# Altium PCB VCU 2026 PCB SID.PcbDoc (part 2 of 2)
Units mm, origin at the board's own origin, x right, y up, seen from the top; angles counter-clockwise.
Board outline 180 x 100 mm, 2 copper layers (Top Layer, Bottom Layer); 108 components, 87 nets, 411 pads, 271 vias.
Unrouted connection lines stored in the file: 2.
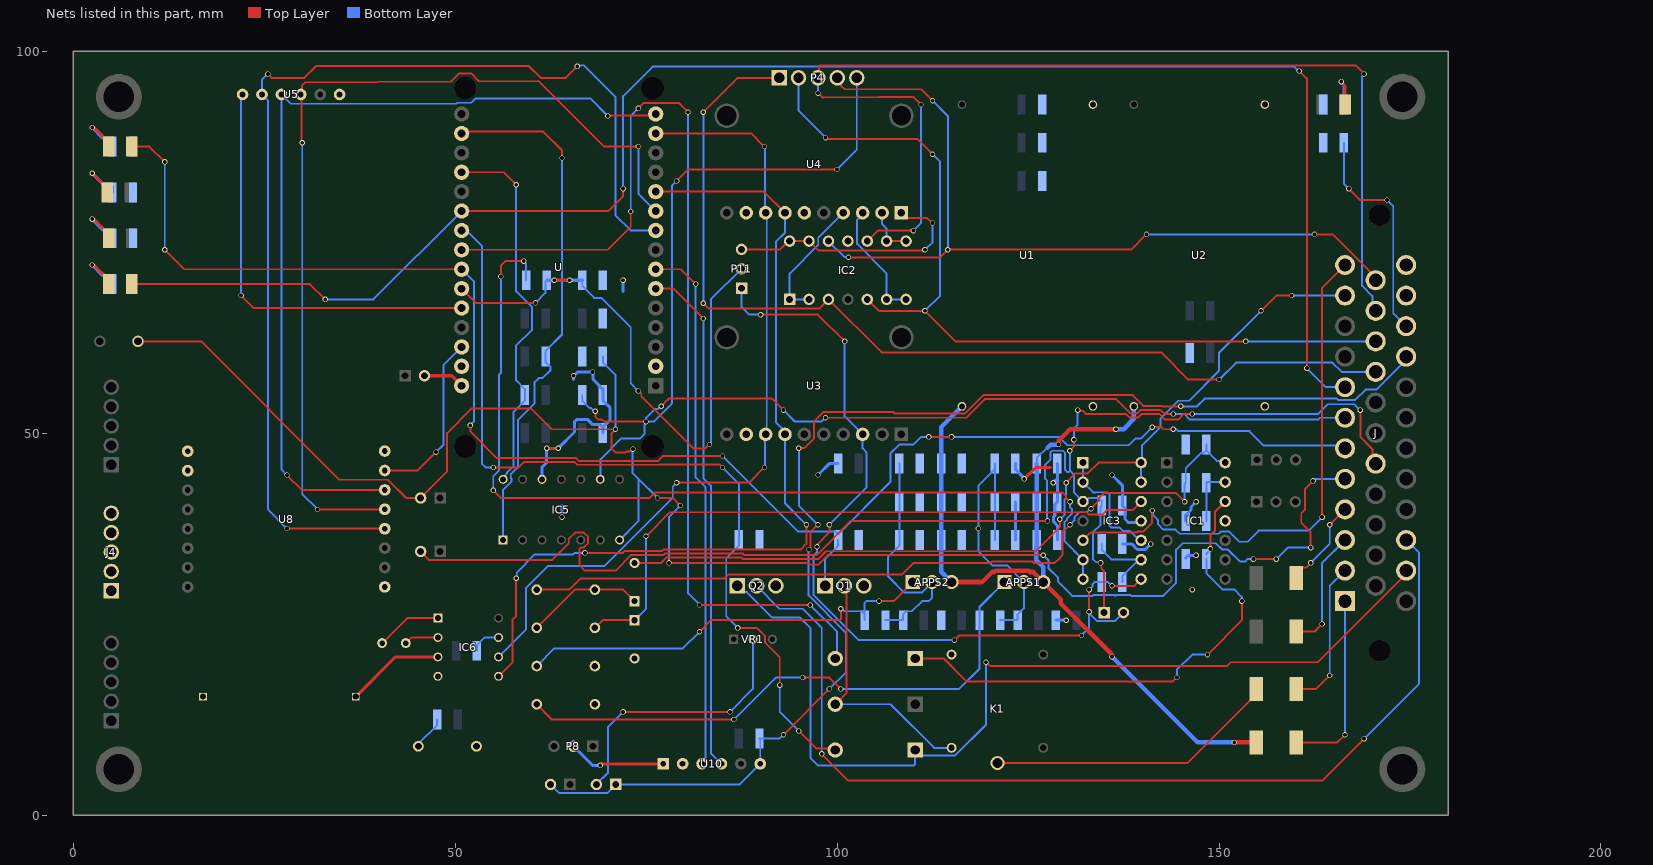
[diagram p2: the nets of this part, all layers, seen from the top]

## Via types
v1: diameter 0.7, hole 0.5, Top Layer to Bottom Layer, 270 vias
v2: diameter 3.5, hole 2.1, Top Layer to Bottom Layer, 1 vias

## Nets (pads, with @x,y where several pads share a name; then routed paths per layer and width w, separated by ;. In a path a pad name is that pad's centre, name@x,y a point inside that pad or via, vN(x,y) a via of type N, cw(c..) or ccw(c..) an arc to the next point about the centre after c; other vN are vias at no path point) (continued)
CANL: J.32 P2.2 P5.1 R49.1 U10.6 | length 168.2
  Top Layer w0.254: v1(93,10.5) v1(99,16.5) ; v1(95,48) 95.037,48.037 95.731,48.037 97,49.306 97,51.534 98.197,52.731 107.384,52.731 107.561,52.554 116.747,52.554 119.147,54.954 138.739,54.954 140.169,53.524 142.574,53.524 142.598,53.5 v1(145,53.5) ; v1(96.325,34.747) 96.325,34.868 96.5,35.042 96.5,37 v1(97.5,38)
  Bottom Layer w0.254: P2.2@62.5,4 63.631,2.869 69.909,2.869 P5.1@71.04,4 87.25,4 U10.6@89.95,6.7 89.95,9.9 R49.1@89.85,10 92.466,10 92.966,10.5 v1(93,10.5) ; v1(95,48) 95,40.5 v1(97.5,38) ; v1(96.325,34.747) 96.269,34.691 96.269,28.746 101.151,23.864 101.151,18.651 v1(99,16.5) ; v1(145,53.5) 147.121,53.5 148.121,54.5 165.434,54.5 165.635,54.3 167.8,54.3 169.193,55.694 170.588,55.694 174.5,59.605 J.32@174.5,60
CANL_Switch: P5.2 VR1.2 | length 35.7
  Top Layer w0.254: v1(72,13.5) v1(86,13.5)
  Bottom Layer w0.254: P5.2@68.5,4 70,5.5 70,11.5 v1(72,13.5) ; v1(86,13.5) 89,16.5 VR1.2@89,23
CS: IC3.3 J.17 P3.1 P7.2 R16.1 | length 186.5
  Top Layer w0.254: P7.2@45.5,34.5 46.631,33.369 62.655,33.369 64.886,35.6 64.886,36.144 65.708,36.966 66.86,36.966 67.426,36.4 67.426,35.6 66.86,35.034 66.534,35.034 66.269,34.769 66.269,32.731 67,32 71.007,32 73.063,34.056 77.304,34.056 77.487,34.239 87.657,34.239 87.88,34.016 97.331,34.016 101.815,38.5 v1(127.554,38.5) ; v1(130.468,47.671) 131,48.203 v1(131,49.133) ; v1(131.5,53) 131.585,52.915 132.135,52.915 132.55,52.5 137.799,52.5 138.253,52.046 139.457,52.046 139.906,52.495 142.166,52.495 142.892,51.769 144.673,51.769 145.404,52.5 v1(146.5,52.5) ; v1(134.5,33) 134.585,32.915 134.585,32.301 134.96,31.926 P3.1@134.96,26.5 ; v1(168.5,53) 168.5,49.502 170.089,47.913 170.089,46.411 J.17@170.5,46
  Bottom Layer w0.254: v1(127.554,38.5) 127.5,38.554 127.5,43.78 127.219,44.061 127.219,45.803 127.919,46.503 127.919,47.01 127.919,47.458 128.142,47.681 128.589,47.681 129.558,47.681 129.849,47.39 129.849,45.182 130.141,44.89 130.351,44.89 130.5,45.039 ; v1(130.468,47.671) 130.5,47.639 130.5,45.039 ; v1(131,49.133) 131,50.608 131.5,51.108 v1(131.5,53) ; v1(134.5,33) 134.415,33.085 133.915,33.085 133.496,33.504 133.496,36.996 134.5,38 134.5,40.35 R16.1@134.65,40.5 134.65,41.049 134.227,41.472 133.868,41.472 133.84,41.5 132.962,41.5 132.502,41.04 IC3.3@132.19,41.04 131,42.23 131,44.539 130.5,45.039 ; v1(146.5,52.5) 146.519,52.481 156.422,52.481 156.441,52.5 163,52.5 164.267,53.767 167.733,53.767 v1(168.5,53)
CS_amped: IC3.8 P3.2 P11.1 R5.1 U3.3 | length 112.5
  Top Layer w0.254: v1(90,65.492) 90.008,65.5 97.5,65.5 v1(101,62) ; v1(97.388,35.106) 97.473,35.192 97.473,35.473 99,37 v1(99,38) ; v1(115.38,22.896) 115.984,23.5 v1(132,23.5) ; v1(133,26.615) v1(133,29.5) ; v1(136,30) 138.92,30 139.8,30.88 IC3.8@139.81,30.88
  Bottom Layer w0.254: P11.1@87.5,68.96 87.5,66.5 88.508,65.492 v1(90,65.492) ; v1(97.388,35.106) 97.375,35.094 97.375,34.375 96.948,33.948 96.948,28.784 102.837,22.896 v1(115.38,22.896) ; v1(99,38) 103.854,42.854 103.854,47.488 103.35,47.992 U3.3@103.35,49.832 101,52.182 v1(101,62) ; v1(132,23.5) 133,24.5 v1@133,26.336 ; v1(133,26.615) 133.085,26.53 133.085,26.336 134.052,25.369 136.369,25.369 P3.2@137.5,26.5 ; v1(133,29.5) 133.445,29.945 133.445,30.226 133.719,30.5 R5.1@134.65,30.5 135.5,30.5 v1(136,30)
CS_buff: IC3.1 IC3.2 IC3.10 | length 15.7
  Bottom Layer w0.254: IC3.1@132.19,46.12 IC3.2@132.19,43.58 133.529,42.241 133.899,42.241 133.912,42.254 135.388,42.254 135.654,41.988 135.654,37.884 135.888,37.65 136.962,37.65 137.431,37.181 138.319,37.181 139.54,35.96 IC3.10@139.81,35.96
CS_LR: U8.15 U.28 | length 22.9
  Top Layer w0.254: U8.15@40.8,45.1 45.1,45.1 v1(47.5,47.5)
  Bottom Layer w0.254: v1(47.5,47.5) 48.5,48.5 48.5,58.916 U.28@50.863,61.279
CS_SD: U5.1 U.26 | length 55.9
  Top Layer w0.254: v1(22,68) 23.641,66.359 U.26@50.863,66.359
  Bottom Layer w0.254: v1(22,68) 22,94.132 U5.1@22.189,94.321
ESP_5V: P1.2 U.30 | length 5.4
  Top Layer w0.4: P1.2@46,57.5 49.562,57.5 U.30@50.863,56.199
GND: B1.N B2.1 C2.2 C3.1 C4.1 C5.1 C6.1 C7.1 C8.1 C9.1 C10.1 C11.1 C12.1 C13.1 C14.1 C15.1 C16.1 C17.1 IC1.11 IC2.11 IC3.11 IC5.12 IC6.4 J4.1 J4.2 J4.3 J4.4 J4.5 J.34 J.35 K1.4 Q1.3 Q2.3 R6.1 R9.2 R10.1 R13.1 R14.1 R15.1 R16.2 R24.1 R25.1 R28.1 R29.1 R30.2 R31.1 R33.1 R38.2 R39.2 R41.2 R42.1 R43.1 R44.1 R45.2 R46.1 R50.2 R51.1 U1.2 U1.3 U2.2 U2.3 U3.9 U4.6 U4.9 U5.6 U8.1 U8.2 U8.9 U8.16 U10.2 U.2 U.29 | length 75.1
  Top Layer w0.4: v1(62,48) v1(63.5,48) ; v1(124.5,44) 126,45.5 127.95,45.5
  Bottom Layer w0.4: IC5.12@61.38,43.94 61.38,45.525 62,46.145 v1(62,48) ; v1(63.5,48) 65.646,50.146 65.646,51.488 65.912,51.754 67.388,51.754 68.042,51.1 69,51.1 R9.2@69.35,50.75 ; v1(64,39) 64,40.5 ; 65.5,57 v1(65.5,57.5) 65.581,57.5 66.081,58 v1(68,58) 68.05,57.95 68.05,57.05 69.35,55.75 R41.2@69.35,55 69.35,54.25 70.304,53.296 70.304,51.704 R9.2@69.35,50.75 ; R9.2@69.35,50 R9.2@69.35,50.75 ; 72,68.5 v1(72,70) ; v1(97.5,44.5) 99,46 R28.1@100.15,46 ; C14.1@123.35,36 C13.1@123.35,41 ; C9.1@123.35,46 123.35,45.25 124.443,44.157 124.443,44.057 v1(124.5,44) ; v1(128.3,43.5) 128.3,43.55 128.85,44.1 ; R13.1@128.65,25.5 v1(130,25.5) ; C8.1@128.85,36 128.85,37.884 128.358,38.377 128.358,39.043 128.5,39.185 128.5,40.65 C7.1@128.85,41 128.85,44.1 ; C6.1@128.85,46 128.85,44.1 ; v1(136,44.5) 137.35,43.15 R16.2@137.35,40.5 137.688,40.162 137.688,38.746 138.159,38.275 139.287,38.275 139.512,38.5 IC3.11@139.81,38.5 ; R6.1@137.35,35.5 138.567,35.5 139.311,34.756 140.357,34.756 v1(141.073,35.472) ; R42.1@145.65,33.65 146,34 v1(147,34) ; R45.2@145.65,38.5 145.65,39.25 146.328,39.928 146.328,40.328 v1(147,41)
  other v1: 146.5,29.5
Log_Switch: IC5.9 J.7 P4.5 R41.1 | length 187.7
  Top Layer w0.254: v1(68.352,52.852) 68.379,52.825 68.379,52.121 68.731,51.769 69.231,51.769 69.5,51.5 v1(75,51.5) ; v1(77,53.5) 77.453,53.953 77.453,54.011 77.942,54.5 91.5,54.5 v1(93,53) ; v1(79,83) 80.5,84.5 v1(100,84.5) ; v1(98.5,52) 116.911,52 119.357,54.446 136.571,54.446 138.463,52.554 139.247,52.554 139.696,53.003 142.377,53.003 142.879,52.5 v1(144,52.5)
  Bottom Layer w0.254: R41.1@66.65,55 66.65,54.25 67.593,53.307 67.777,53.307 68.231,52.852 v1(68.352,52.852) ; IC5.9@69,43.94 69.05,43.99 69.05,46.584 71.759,49.293 74.237,49.293 74.793,49.849 74.793,51.172 75,51.379 v1(75,51.5) ; v1(77,53.5) 76.879,53.5 76.523,53.143 76.143,53.143 75.013,52.013 75.013,51.513 v1(75,51.5) ; v1(79,83) 78.419,82.419 78.419,53.919 76,51.5 v1(75,51.5) ; v1(93,53) 94.5,51.5 97.966,51.5 98.466,52 v1(98.5,52) ; v1(100,84.5) 102.58,87.08 P4.5@102.58,96.5 ; v1(144,52.5) 145.466,52.5 146.197,51.769 162.987,51.769 163.218,52 J.7@166.5,52
Log_Switch*: IC5.14 R36.2 U.19 | length 49.8
  Top Layer w0.254: U.19@50.863,84.139 56.361,84.139 v1(58,82.5)
  Bottom Layer w0.254: IC5.14@56.3,43.94 56.3,44.188 56.785,44.673 56.785,44.791 57.624,45.63 57.624,52.724 59.15,54.25 R36.2@59.15,55 59.15,55.75 58,56.9 58,61.461 60.081,63.542 60.081,66.458 58,68.539 v1(58,82.5)
LogLed: D2.1 J.8 U.21 | length 219.5
  Top Layer w0.254: D2.1@7.652,69.5 31,69.5 v1(33,67.5) ; U.21@50.863,79.059 70.059,79.059 72,81 v1(72,82) ; v1(160.5,97.381) 161.5,96.381 v1(161.5,58.5)
  Bottom Layer w0.254: v1(33,67.5) 39.304,67.5 U.21@50.863,79.059 ; v1(72,82) 72,94.109 75.857,97.966 159.872,97.966 160.457,97.381 v1(160.5,97.381) ; v1(161.5,58.5) 164,56 J.8@166.5,56
LVMSOut: APPS1.3 APPS2.3 C3.2 C4.2 C5.2 C6.2 C7.2 C8.2 F1.2 U1.1 U2.1 | length 108.5
  Top Layer w0.254: APPS1.3@127,30.5 APPS1.3@127,30.801
  Top Layer w0.6: APPS2.3@115,30.5 119,30.5 120.311,31.811 120.588,31.811 120.761,31.984 125.075,31.984 125.248,31.811 125.689,31.811 126.699,30.801 APPS1.3@127,30.801 ; APPS1.3@127,30.5 129.258,28.242 129.258,27.742 135.971,21.029 135.971,20.75 v1(135.991,20.731) ; v1(129,48.5) 129.019,48.519 129.019,49.019 130.5,50.5 v1(136.5,50.5) ; v1(152,9.5) F1.2@154.885,9.5
  Bottom Layer w0.254: C6.2@126.15,46 126.15,46.75 127.505,48.105 127.603,48.105
  Bottom Layer w0.6: APPS2.3@115,30.5 113.65,31.85 C5.2@113.65,36 C4.2@113.65,41 C3.2@113.65,46 113.65,50.795 U1.1@116.355,53.5 ; C6.2@126.15,46 C7.2@126.15,41 126.15,35.25 126.096,35.196 126.096,33.372 127,32.468 APPS1.3@127,30.5 ; 127.603,48.105 127.979,48.481 128.981,48.481 v1(129,48.5) ; v1(135.991,20.731) 147.222,9.5 v1(152,9.5) ; v1(136.5,50.5) 136.519,50.519 137.519,50.519 138.855,51.855 U2.1@138.855,53.5
LVMSOut*: F1.1 J.1 | length 24.3
  Top Layer w0.254: F1.1@160.115,9.5 165.5,9.5 v1(166.5,10.5)
  Bottom Layer w0.254: v1(166.5,10.5) J.1@166.5,28
MC_Revert: IC3.5 J.12 | length 72
  Top Layer w0.254: IC3.5@132.19,35.96 133.23,37 139.251,37 139.342,37.091 140.104,37.091 141.255,38.243 v1(141.255,39.852) ; v1(163.5,39) 163.5,69 J.12@166.5,72
  Bottom Layer w0.254: v1(141.255,39.852) 141.341,39.767 141.341,39.287 142.031,38.597 142.031,38.059 142.722,37.369 144.289,37.369 144.839,36.819 149.966,36.819 150.238,37.091 151.326,37.091 152.648,35.769 153.735,35.769 155.197,37.231 161.731,37.231 v1(163.5,39)
MC_Revert*: IC3.6 IC3.7 R23.2 | length 124.2
  Top Layer w0.254: v1(55,42.5) 56,41.5 75.466,41.5 76.197,42.231 129.5,42.231 129.963,41.768 129.963,41.549 v1(130.512,41) ; v1(56,70.5) 56,71.919 56.581,72.5 v1(59,72.5)
  Bottom Layer w0.254: v1(55,42.5) 55,44.363 55.769,45.132 55.769,57.64 56,57.871 v1(56,70.5) ; v1(59,72.5) 59,72.419 59.308,72.11 R23.2@59.308,70 ; v1(130.512,41) 130.517,40.995 130.517,40.269 130.731,40.055 130.731,39.449 130.105,38.823 130.105,38.639 129.769,38.303 129.769,37.47 129.781,37.458 129.781,35.856 132.19,33.447 IC3.7@132.19,30.88
MC_Revert**: P11.2 R23.1 R24.2 U.25 | length 74.3
  Top Layer w0.254: U.25@50.863,68.899 52.762,67 60.5,67 v1(60.536,67.036) ; v1(74,55.5) 74.374,55.126 74.374,54.831 81.205,48 82.723,48 83.223,48.5 v1(83.304,48.5)
  Top Layer w0.4: v1(63,70) v1(65,70)
  Bottom Layer w0.254: v1(60.536,67.036) 61.834,68.334 61.834,69.826 R23.1@62.008,70 ; R24.2@66.65,70 66.65,69.25 68.206,67.694 69.148,67.694 73,63.842 73,56.5 v1(74,55.5) ; v1(83.304,48.5) 83.304,48.581 83.5,48.777 83.5,67.5 P11.2@87.5,71.5
  Bottom Layer w0.4: R23.1@62.008,70 v1(63,70) ; v1(65,70) R24.2@66.65,70
MISO: U5.4 U8.13 U.10 | length 123.2
  Top Layer w0.254: v1(30,88) 29.915,88.085 29.915,94.236 30,94.321 29.964,94.357 29.964,95.464 30.387,95.887 49.405,96.025 49.509,96.025 49.583,96.099 50.554,97.07 52.112,97.07 53.056,96.127 53.13,96.052 53.237,96.052 60.893,96.107 69.5,87.5 v1(74,87.5) ; v1(32,40) 32.01,40.01 40.79,40.01 U8.13@40.8,40.02
  Bottom Layer w0.254: v1(30,88) 30,42 v1(32,40) ; v1(74,87.5) 74,81.322 U.10@76.263,79.059
MOSI: U5.3 U8.14 U.15 | length 114.6
  Top Layer w0.254: v1(28,44.5) 29.94,42.56 U8.14@40.8,42.56 ; v1(70,91.5) 70.057,91.557 76.061,91.557 U.15@76.263,91.759
  Bottom Layer w0.254: v1(28,44.5) 27.269,45.231 U5.3@27.269,94.321 28.485,93.105 50.153,93.105 50.283,93.235 52.142,93.235 52.711,93.804 67.696,93.804 v1(70,91.5)
motorcontroller: C1.2 IC3.13 IC3.14 J.11 | length 116.4
  Top Layer w0.254: C1.2@73.5,33 76.966,33 77.697,33.731 87.446,33.731 87.669,33.508 97.542,33.508 98.558,34.524 126.024,34.524 129.17,37.67 129.17,38.701 v1(129.162,38.71) ; v1(130,43.5) 131.211,44.711 132.82,44.711 134.229,46.12 IC3.14@139.81,46.12 ; v1(155.5,66) 157.5,68 v1(159.5,68)
  Bottom Layer w0.254: v1(129.162,38.71) 129.184,38.71 129.781,39.306 129.781,41.303 130,41.522 v1(130,43.5) ; IC3.13@139.81,43.58 IC3.14@139.81,46.12 139.943,46.253 139.943,48.409 142.32,50.786 142.32,51.854 144.697,54.231 146.094,54.231 150,58.137 150,60.5 v1(155.5,66) ; v1(159.5,68) J.11@166.5,68
NetAPPS1_1: APPS1.1 R11.2 R25.2 | length 75.5
  Top Layer w0.254: R25.2@60.69,14.5 62.69,12.5 v1(86.5,12.5) ; v1(95.5,18) 98.993,18 v1(100.493,16.5)
  Bottom Layer w0.254: v1(86.5,12.5) 92,18 v1(95.5,18) ; v1(100.493,16.5) 116,16.5 118.65,19.15 R11.2@118.65,25.5 118.65,27.23 APPS1.1@121.92,30.5
NetAPPS1_2: APPS1.2 C9.2 C13.2 C14.2 R7.2 R11.1 | length 36.9
  Bottom Layer w0.254: C14.2@120.65,36 C13.2@120.65,41 C9.2@120.65,45.25 ; C9.2@120.65,46 C9.2@120.65,45.25 ; R11.1@121.35,25.5 R7.2@123.65,25.5 123.65,26.25 124.46,27.06 APPS1.2@124.46,30.5 122.276,32.684 120.316,32.684 118.5,34.5 118.5,43.1 C9.2@120.65,45.25
  other v1: 118.5,37.5
NetAPPS2_1: APPS2.1 R10.2 R12.2 | length 57
  Top Layer w0.254: v1(82,24) 83.5,25.5 100.344,25.5 100.493,25.649 v1(100.493,27) ; v1(105.5,28) 107.42,28 APPS2.1@109.92,30.5
  Bottom Layer w0.254: R10.2@60.5,19.5 R10.2@60.69,19.5 63.007,21.817 79.817,21.817 v1(82,24) ; v1(100.493,27) 100.614,27 100.941,26.673 103.227,26.673 R12.2@103.6,26.3 ; R12.2@103.6,25.55 103.6,27.766 103.834,28 v1(105.5,28)
NetAPPS2_2: APPS2.2 C15.2 C16.2 C17.2 R8.2 R12.1 | length 32.4
  Bottom Layer w0.254: R12.1@106.35,25.5 R8.2@108.65,25.5 108.65,26.25 109.073,26.673 109.813,26.673 111.14,28 112,28 112.46,28.46 APPS2.2@112.46,30.5 111.076,29.116 108.802,29.116 106.696,31.222 106.696,33.796 108.15,35.25 C17.2@108.15,36 C16.2@108.15,41 C15.2@108.15,46
NetB1_P: B1.P R3.2 | length 4.5
  Bottom Layer w0.254: B1.P@45.2,9 45.2,9.3 47.65,11.75 R3.2@47.65,12.5
NetB2_1: B2.2 IC6.3 | length 12.9
  Top Layer w0.4: B2.2@37,15.5 42.192,20.692 IC6.3@47.757,20.692
NetB2_2: 
NetC1_1: C1.1 R1.2 R2.1 | length 15.5
  Top Layer w0.254: R2.1@60.69,24.5 65.69,29.5 R1.2@68.31,29.5 72,29.5 C1.1@73.5,28
NetC2_1: C2.1 IC3.12 R2.2 | length 84.1
  Top Layer w0.254: R2.2@68.31,24.5 69.31,25.5 C2.1@73.5,25.5 ; v1(75,36.5) 78.131,39.631 132.658,39.631 132.94,39.35 134.78,39.35 135.339,39.909 138.679,39.909 IC3.12@139.81,41.04
  Bottom Layer w0.254: C2.1@73.5,25.5 75,27 v1(75,36.5)
NetD1_2: D1.2 R29.2 | length 7.6
  Top Layer w0.4: v1(2.5,78) 2.557,77.943 2.759,77.943 4.652,76.05 D1.2@4.652,75.5
  Bottom Layer w0.4: v1(2.5,78) 3.9,76.6 4.8,76.6 5.15,76.25 R29.2@5.15,75.5
NetD2_2: D2.2 R31.2 | length 7.6
  Top Layer w0.4: v1(2.5,72) 2.557,71.943 2.759,71.943 4.652,70.05 D2.2@4.652,69.5
  Bottom Layer w0.4: v1(2.5,72) 3.9,70.6 4.8,70.6 5.15,70.25 R31.2@5.15,69.5
NetD3_2: D3.2 R15.2 | length 7.5
  Top Layer w0.4: v1(2.5,84) 2.55,84 4.5,82.05 D3.2@4.5,81.5
  Bottom Layer w0.4: v1(2.5,84) 3.9,82.6 4.8,82.6 5.15,82.25 R15.2@5.15,81.5
NetD4_2: D4.2 R33.2 | length 7.6
  Top Layer w0.4: v1(2.5,90) 2.557,89.943 2.759,89.943 4.652,88.05 D4.2@4.652,87.5
  Bottom Layer w0.4: v1(2.5,90) 3.9,88.6 4.8,88.6 5.15,88.25 R33.2@5.15,87.5
NetD5_2: D5.2 R46.2 | length 6.4
  Top Layer w0.4: v1(166,96) 166,95.919 166.5,95.419 D5.2@166.5,93
  Bottom Layer w0.4: v1(166,96) 166,95.919 166.35,95.569 R46.2@166.35,93
NetD6_2: D6.2 IC1.12 R42.2 | length 66.7
  Top Layer w0.254: D6.2@110.23,20.5 113.939,20.5 116.939,17.5 143.966,17.5 144.466,18 v1(144.5,18) ; v1(148.5,21) 153,25.5 v1(153,28) ; v1(148.869,34.842) 148.869,36.612 149.5,37.244 149.5,39.73 IC1.12@150.81,41.04
  Bottom Layer w0.254: v1(144.5,18) 144.5,19 146.5,21 v1(148.5,21) ; R42.2@148.35,33.5 148.35,31.637 150.452,29.535 151.965,29.535 152.987,28.513 152.987,28.013 v1(153,28) ; R42.2@148.35,34.1 148.35,34.223 148.773,34.646 148.773,34.746 v1(148.869,34.842)
NetD7_1: D7.1 K1.2 Q1.2 | length 33.8
  Top Layer w0.254: D7.1@99.77,14.5 101.224,15.954 101.224,29.741 Q1.2@100.965,30
  Bottom Layer w0.254: D7.1@99.77,14.5 107,14.5 112.7,8.8 K1.2@115,8.8
NetF2_1: F2.1 J.2 | length 19.7
  Top Layer w0.254: F2.1@160.115,16.5 162.731,16.5 v1(164.5,18.269)
  Bottom Layer w0.254: v1(164.5,18.269) 164.5,30 J.2@166.5,32
NetF3_1: F3.1 J.3 | length 16
  Top Layer w0.254: F3.1@160.115,24 162.5,24 v1@163.478,24.978
  Bottom Layer w0.254: v1(163.5,25) 163.5,33 J.3@166.5,36
NetF4_1: F4.1 J.4 | length 12
  Top Layer w0.254: F4.1@160.115,31 160.115,31.685 160.805,32.375 161.412,32.375 162,32.963 v1(162,33) ; v1(164.5,38) J.4@166.5,40
  Bottom Layer w0.254: v1(162,33) 164.5,35.5 v1(164.5,38)
NetIC1_13: IC1.13 R45.1 R47.2 | length 7.5
  Bottom Layer w0.254: R45.1@148.35,38.5 R47.2@148.35,43.5 148.43,43.58 IC1.13@150.81,43.58
NetIC3_9: IC3.9 R5.2 R6.2 | length 10.6
  Bottom Layer w0.254: R6.2@134.65,35.5 134.65,34.75 135.98,33.42 IC3.9@139.81,33.42 139.52,33.42 137.35,31.25 R5.2@137.35,30.5
NetIC6_1: IC6.1 Y1.1 | length 8.7
  Top Layer w0.254: Y1.1@40.45,22.5 43.722,25.772 IC6.1@47.757,25.772
NetIC6_2: IC6.2 Y1.2 | length 4.5
  Top Layer w0.254: Y1.2@43.55,22.5 44.282,23.232 IC6.2@47.757,23.232
NetIC6_7: IC6.7 R52.1 | length 4
  Bottom Layer w0.254: R52.1@52.85,21.5 52.85,22.25 53.832,23.232 IC6.7@55.697,23.232
NetJ_33: J.33 R30.1 | length 29.4
  Top Layer w0.254: v1(167,82) 168.5,80.5 v1(172,80.5)
  Bottom Layer w0.254: R30.1@166.35,88 166.35,82.65 v1(167,82) ; v1(172,80.5) 172.806,79.694 172.806,65.694 J.33@174.5,64
Pump_Ctrl: D8.1 R51.2 U.22 | length 111.6
  Top Layer w0.254: v1(55,45.5) 58.332,45.5 59.063,46.231 65.619,46.231 66,45.85 76.833,45.85 76.847,45.864 84.628,45.864 84.993,45.5 v1(85,45.5) ; v1(87,24.5) 89.5,24.5 90.55,23.45 90.55,22.59 92.5,20.64 v1(92.5,17) ; v1(95,11) 97.269,8.731 99.539,8.731 D8.1@99.77,8.5
  Bottom Layer w0.254: U.22@50.863,76.519 51.169,76.213 51.787,76.213 53.5,74.5 53.5,46 54,45.5 v1(55,45.5) ; v1(85,45.5) 87.15,43.35 R51.2@87.15,36 87.15,35.25 85.5,33.6 85.5,26 v1(87,24.5) ; v1(92.5,17) 92.5,13.5 v1(95,11)
Pump_Mannual: D8.2 J.25 Q2.1 | length 124.9
  Top Layer w0.254: v1(119.5,20) 119.534,20 120.042,19.492 151.013,19.492 151.521,20 162.895,20 174.5,31.605 J.25@174.5,32
  Bottom Layer w0.254: Q2.1@86.93,30 87.758,29.172 88.197,29.172 91.524,25.846 95.154,25.846 96.5,24.5 96.5,7.5 97.5,6.5 110.081,6.5 110.23,6.649 D8.2@110.23,8.5 110.961,7.769 115.427,7.769 119.5,11.842 v1(119.5,20)
Pump_Sink: J.26 Q2.2 | length 131.7
  Top Layer w0.254: v1(98,8) 98,7.966 101.466,4.5 163.5,4.5 v1(169,10)
  Bottom Layer w0.254: Q2.2@89.465,30 92.465,27 95.5,27 98,24.5 v1(98,8) ; v1(169,10) 176.194,17.194 176.194,34.306 J.26@174.5,36
PWM: D6.1 U.23 | length 134.8
  Top Layer w0.254: U.23@50.863,73.979 50.873,73.989 69.989,73.989 73,77 v1(73,79) ; v1(74,92.5) 74.713,93.213 79.287,93.213 v1(80.5,92) ; v1(82,27.5) 82.005,27.495 96.486,27.495 v1(96.49,27.49)
  Bottom Layer w0.254: v1(73,79) 73,91.5 v1(74,92.5) ; v1(80.5,92) 80.5,29 v1(82,27.5) ; v1(96.49,27.49) 96.49,27.476 100,23.966 100,20.73 D6.1@99.77,20.5
PWM_amped: IC1.14 R1.1 R43.2 R47.1 | length 104.9
  Top Layer w0.254: R1.1@60.69,29.5 64.972,29.5 66.456,30.984 85.32,30.984 85.836,31.5 108.521,31.5 110.021,33 120.095,33 120.268,33.173 125.567,33.173 125.74,33 128.5,33 128.769,33.269 128.803,33.269 129.231,33.697 129.231,33.731 129.5,34 129.5,37 v1(130.5,38) ; v1(133.243,40.081) 134.283,41.121 134.283,41.469 134.984,42.171 144.329,42.171 v1(145.5,41)
  Bottom Layer w0.254: v1(130.5,38) 131.059,38.559 131.059,38.968 131.722,39.631 132.672,39.631 133.122,40.081 v1(133.243,40.081) ; v1(145.5,41) 145.5,43.35 R47.1@145.65,43.5 145.65,45.4 147.65,47.4 148,47.4 R43.2@148.35,47.75 ; R43.2@148.35,48.5 R43.2@148.35,47.75 ; IC1.14@150.81,46.12 150.6,46.33 149.77,46.33 R43.2@148.35,47.75
RTD_button: IC5.7 J.5 P6.2 R39.1 S1.2 | length 233.6
  Top Layer w0.254: S1.2@8.5,62 16.751,62 34.867,43.884 41.196,43.884 43.58,41.5 P6.2@45.5,41.5 48.968,44.968 48.968,50.002 52.197,53.231 59.925,53.231 62.656,50.5 v1(71,50.5) 71,50.458 70.504,49.962 70.504,47.962 70.995,47.471 72.344,47.471 72.437,47.563 72.925,47.563 73.254,47.892 v1(73.297,47.892) ; v1(76.5,41.5) 78.508,41.5 v1(79.5,40.508) ; v1(78,33) 96.248,33 96.487,32.761 97.513,32.761 98.768,34.016 126.984,34.016 v1(127,34) ; v1(154.5,33.5) v1(157.5,33.5) ; v1(162,35) 162,37 160.769,38.231 160.769,39.521 161.269,40.021 161.269,42.688 v1(162.322,43.741)
  Bottom Layer w0.254: R39.1@69.35,60 69.35,59.25 71,57.6 v1(71,50.5) ; IC5.7@71.54,36 74,38.46 74,44 ; v1(73.297,47.892) 73.211,47.807 73.211,44.789 74,44 ; v1(76.5,41.5) 74,44 ; v1(78,33) 78,39.008 v1(79.5,40.508) ; v1(127,34) 127.681,33.319 127.681,32.319 128.927,31.073 128.927,30.539 130.77,28.696 133.474,28.696 133.571,28.793 136.349,28.793 136.446,28.696 136.453,28.696 136.55,28.793 138.45,28.793 138.547,28.696 142.709,28.696 144.394,30.381 144.394,34.736 145.231,35.573 149.598,35.573 150.415,34.756 151.177,34.756 152.754,33.179 153.406,33.179 153.727,33.5 v1(154.5,33.5) ; v1(157.5,33.5) 159.038,35.037 161.963,35.037 v1(162,35) ; v1(162.322,43.741) 162.581,44 J.5@166.5,44
RTD_button*: IC5.1 R35.2 U.17 | length 69.4
  Top Layer w0.254: U.17@50.863,89.219 51.144,89.5 61.5,89.5 64,87 v1(64,86)
  Bottom Layer w0.254: IC5.1@56.3,36 56.3,42.574 57.366,43.64 57.366,44.026 57.293,44.099 57.293,44.581 58.219,45.507 58.219,51.68 60.411,53.872 60.411,56.668 60.932,57.189 61.437,57.189 62.5,58.252 62.5,58.678 62.351,58.827 62.273,58.827 61.85,59.25 61.85,60.75 64,62.9 v1(64,86)
RTD_Led: D4.1 J.6 Q1.1 R44.2 U.24 | length 216.1
  Top Layer w0.254: D4.1@7.652,87.5 10,87.5 v1(12,85.5) ; v1(12,74) 14.561,71.439 U.24@50.863,71.439 ; v1(52,51) 52,50.232 53.751,48.481 53.751,48.405 55.417,46.739 65.829,46.739 66.21,46.358 76.622,46.358 77.264,47 v1(85,47) ; v1(112,49.5) v1(115,49.5) ; v1(141.267,50.767) 142.457,50.767 142.724,50.5 v1(144,50.5)
  Bottom Layer w0.254: v1(12,74) v1(12,85.5) ; U.24@50.863,71.439 52.5,69.802 52.5,51.534 52,51.034 v1(52,51) ; v1(85,47) 94.9,37.1 99.8,37.1 100.15,36.75 107,43.6 107,47.342 108.147,48.489 109.99,48.489 111,49.5 v1(112,49.5) ; Q1.1@98.43,30 98.43,33.53 100.15,35.25 R44.2@100.15,36 ; v1(115,49.5) 129.034,49.5 130.132,48.402 138.186,48.402 139.053,49.269 139.769,49.269 v1(141.267,50.767) ; v1(144,50.5) 144.057,50.443 144.478,50.443 144.667,50.254 153.986,50.254 155.882,48.358 166.142,48.358 J.6@166.5,48
rts_1: IC2.10 J.22 P4.3 | length 144.9
  Top Layer w0.254: v1(97.5,94.5) 98.072,93.928 98.239,93.928 105.561,93.992 110.008,93.992 v1(111,93) ; P4.3@97.5,96.5 97.612,96.612 97.612,97.964 97.761,98.112 167.888,98.112 v1(169,97) ; IC2.10@103.96,75.12 105.34,76.5 v1(110,76.5)
  Bottom Layer w0.254: v1(97.5,94.5) P4.3@97.5,96.5 ; v1(110,76.5) 111,77.5 v1(111,93) ; v1(169,97) 169,96.919 168.733,96.652 168.733,69.268 170.089,67.913 170.089,66.411 J.22@170.5,66
rts_1*: IC2.8 IC2.9 U4.2 | length 6.5
  Top Layer w0.254: IC2.9@106.5,75.12 IC2.8@109.04,75.12
  Bottom Layer w0.254: U4.2@105.89,78.832 105.895,78.827 105.895,77.343 106.5,76.739 IC2.9@106.5,75.12
rts_2: IC2.12 J.23 P4.4 | length 110.8
  Top Layer w0.254: P4.4@100.04,96.5 100.04,96.06 100.51,95.59 100.51,95.49 101,95 111,95 v1(112.5,93.5) ; v1(101.5,73) 113.5,73 v1(114.5,74) 138.5,74 v1(140.5,76) ; v1(162.5,76) 164.895,76 170.5,70.395 J.23@170.5,70
  Bottom Layer w0.254: IC2.12@98.88,75.12 100.943,73.057 101.443,73.057 v1(101.5,73) ; v1(112.5,93.5) 114.5,91.5 v1(114.5,74) ; v1(140.5,76) v1(162.5,76)
rts_2*: IC2.13 IC2.14 P11.3 U4.1 | length 33.5
  Top Layer w0.254: P11.3@87.5,74.04 92.55,74.04 93.63,75.12 IC2.14@93.8,75.12 IC2.13@96.34,75.12 97.544,73.916 111.335,73.916 111.419,74 v1(111.5,74) ; U4.1@108.43,78.832 109.119,78.143 111.8,78.143 112.443,77.5 v1(112.5,77.5)
  Bottom Layer w0.254: v1(111.5,74) 112.5,75 v1(112.5,77.5)
RUN: F2.2 K1.1 | length 38.3
  Top Layer w0.254: K1.1@121,6.8 145.87,6.8 154.885,15.815 F2.2@154.885,16.5
Rx_CAN: U10.4 U.6 | length 67.1
  Top Layer w0.254: U.6@76.263,68.899 78.601,68.899 v1(82.5,65)
  Bottom Layer w0.254: v1(82.5,65) 82.5,44.114 83.5,43.114 83.5,8.07 U10.4@84.87,6.7
SCK: U5.2 U8.12 U.9 | length 144.9
  Top Layer w0.254: v1(25.5,97) 26,96.5 30.282,96.5 31.828,98.046 59.672,98.046 61.218,96.5 64.5,96.5 v1(66,98) ; v1(28,37.5) 28.01,37.49 40.79,37.49 U8.12@40.8,37.48
  Bottom Layer w0.254: v1(25.5,97) 24.729,96.229 U5.2@24.729,94.321 25.5,93.55 25.5,40 v1(28,37.5) ; v1(66,98) 66.085,98.085 66.547,98.085 66.604,98.142 66.858,98.142 71,94 71,78.5 72.981,76.519 U.9@76.263,76.519
SCL: IC6.6 U3.8 U4.8 U.14 | length 106.3
  Top Layer w0.254: U.14@76.263,89.219 88.781,89.219 v1(90.5,87.5) ; v1(79,43.5) 88.5,43.5 v1(90.5,45.5)
  Bottom Layer w0.254: IC6.6@55.697,20.692 59.298,24.293 59.298,29.74 62.152,32.594 69.533,32.594 78.5,41.561 78.5,42.966 79,43.466 v1(79,43.5) ; v1(90.5,45.5) 90.557,45.557 90.557,49.74 U3.8@90.65,49.832 90.804,49.987 90.804,78.678 U4.8@90.65,78.832 90.557,78.925 90.557,87.443 v1(90.5,87.5)
SDA: IC6.5 U3.7 U4.7 U.11 | length 117.6
  Top Layer w0.254: IC6.5@55.697,18.152 57.5,19.955 57.5,25.534 58,26.034 v1(58,31) ; v1(67,34.317) 71.983,34.317 72.231,34.564 77.093,34.564 77.276,34.747 95.247,34.747 95.992,35.492 95.992,37.21 96,37.218 v1(96,38) ; U.11@76.263,81.599 90.423,81.599 U4.7@93.19,78.832
  Bottom Layer w0.254: v1(58,31) 58.074,31.074 58.074,31.731 60.452,34.109 65.463,34.109 65.67,34.317 v1(67,34.317) ; U4.7@93.19,78.832 93.19,76.213 92,75.023 92,51.395 93.19,50.205 U3.7@93.19,49.832 93.19,40.81 v1(96,38)
sp_1: IC2.3 J.20 P4.1 | length 131.4
  Top Layer w0.254: v1(82.5,67) 83.204,66.296 97.676,66.296 IC2.3@98.88,67.5 105.829,60.551 142.449,60.551 146,57 v1(150,57) ; v1(82.5,92) 87,96.5 P4.1@92.42,96.5
  Bottom Layer w0.254: v1(82.5,67) v1(82.5,92) ; v1(150,57) 152.231,59.231 164.839,59.231 166.07,58 J.20@170.5,58
sp_1*: IC2.1 IC2.2 U4.4 | length 16.8
  Bottom Layer w0.254: IC2.2@96.34,67.5 IC2.1@93.8,67.5 93.8,70.877 97.544,74.621 97.544,75.566 U4.4@100.81,78.832
sp_2: IC2.5 J.21 P4.2 | length 114.8
  Top Layer w0.254: v1(98.5,88.674) 98.621,88.674 98.795,88.5 110.5,88.5 v1(112.5,86.5) ; IC2.5@103.96,67.5 105.46,66 v1(111.5,66) 115.5,62 v1(153.5,62)
  Bottom Layer w0.254: P4.2@94.96,96.5 94.96,92.214 v1(98.5,88.674) ; v1(111.5,66) 113.5,68 113.5,85.5 v1(112.5,86.5) ; v1(153.5,62) J.21@170.5,62
sp_2*: IC2.6 IC2.7 U4.3 | length 15.8
  Bottom Layer w0.254: U4.3@103.35,78.832 103.35,78.635 102.624,77.909 102.624,74.753 106.5,70.877 IC2.6@106.5,67.5 IC2.7@109.04,67.5
Tx_CAN: U10.3 U.7 | length 69.6
  Top Layer w0.254: U.7@76.263,71.439 79.561,71.439 v1(81.5,69.5)
  Bottom Layer w0.254: v1(81.5,69.5) 81.5,44.189 82.804,42.885 82.804,7.478 82.33,7.004 U10.3@82.33,6.7
VCC_CAN: P8.2 U10.1 | length 12.9
  Top Layer w0.4: v1(69,6.5) 69.081,6.5 69.281,6.7 U10.1@77.25,6.7
  Bottom Layer w0.4: P8.2@65.5,9 68,6.5 v1(69,6.5)
pads on no net: J. J.27 J.28 J.29 J.30 U3.5 U3.P1 U3.P2 U4.5 U4.P1 U4.P2 U8.4 U8.5 U8.6 U8.7 U8.8 U8.10 U8.11 U. U.3 U.4 U.12 U.13 U.16 U.18 U.27 VR1.3
copper on no net:
  other v1: 68,48
  other v2: 12,24

## Polygon pours and split planes (outlines as drawn)
GND on Bottom Layer "TOPLAYER_GND" (solid, remove dead copper, pour order 1): 1,99 178.5,99 178.5,1 2,1 1.5,1.5
GND on Top Layer "TOPLAYER_GND" (solid, remove dead copper, pour order 0): 1,98.5 1.5,99 178.5,99 178.5,1.5 178,1 1.5,1

## Keep-outs
Keep-Out Layer:
  the board outline again, w0.254

## Silkscreen, mask and mechanical layers (free items; w line width, h text height)
Top Overlay:
  text "12V to 5V" at 120.254,96.254 h1.2
  text "Clean 12V" at 142.754,96.254 h1.2
  text "RTD" at 2.746,86.254 h0.8 r90
  text "Buzz" at 3,79.5 h0.8 r90
  text "APPS" at 2.746,74.254 h0.8 r90
  text "Log" at 2.479,68.254 h0.8 r90
  text "ESP 5V" at 42.254,54.754 h0.8
  text "+5" at 1.754,51.746 h1.2 r270
  text "RTD" at 44.254,38.754 h0.8
  text "AIR" at 47.254,38.754 h0.8
  text "GND" at 1.754,36.246 h1.2 r270
  text "Motorcontroller" at 75.654,32.154 h0.5
  text "CS" at 44.254,31.754 h0.8
  text "BPS" at 47.254,31.754 h0.8
  text "0-10V" at 76.254,30.254 h1.2
  text "+12" at 1.754,18.746 h1.2 r270
  text "GND" at 165.754,1.754 h1.2
  text "Designed by Sidhanth Rao" at 82.5,1.5 h1
  text "VCU 2026" at 147.5,1.5 h1.52
  text "L" at 62.254,1.254 h0.8
  text "H" at 64.754,1.254 h0.8

## Text inside footprints (layer, text, board x,y; h text height)
J: Mechanical 13 "PCB EDGE" at 179.9,45.169 h1.78 r90
U1: Top Overlay "IN+" at 118.514,52.484 h1 r90; Top Overlay "IN-" at 132.23,52.484 h1 r90; Top Overlay "OUT+" at 118.514,89.568 h1 r90; Top Overlay "OUT-" at 132.348,89.497 h1 r90; Top Overlay "LM2596 / Buck Converter" at 126.896,65.946 h1 r90
U2: Top Overlay "LM2596 / Buck Converter" at 149.396,65.946 h1 r90; Top Overlay "IN+" at 141.014,52.484 h1 r90; Top Overlay "OUT+" at 141.203,89.497 h1 r90; Top Overlay "OUT-" at 154.703,89.497 h1 r90; Top Overlay "IN-" at 154.73,52.484 h1 r90